# Altium PCB BOARD_4LAYER.PcbDoc (part 11 of 21)
Units mil, origin at the board's own origin, x right, y up, seen from the top; angles counter-clockwise.
Board outline 6692.91 x 10039.37 mil, 4 copper layers (Top Layer, Mid Layer 1, Mid Layer 2, Bottom Layer), stack 66.299 mil thick; 1532 components, 908 nets, 4105 pads, 1286 vias.
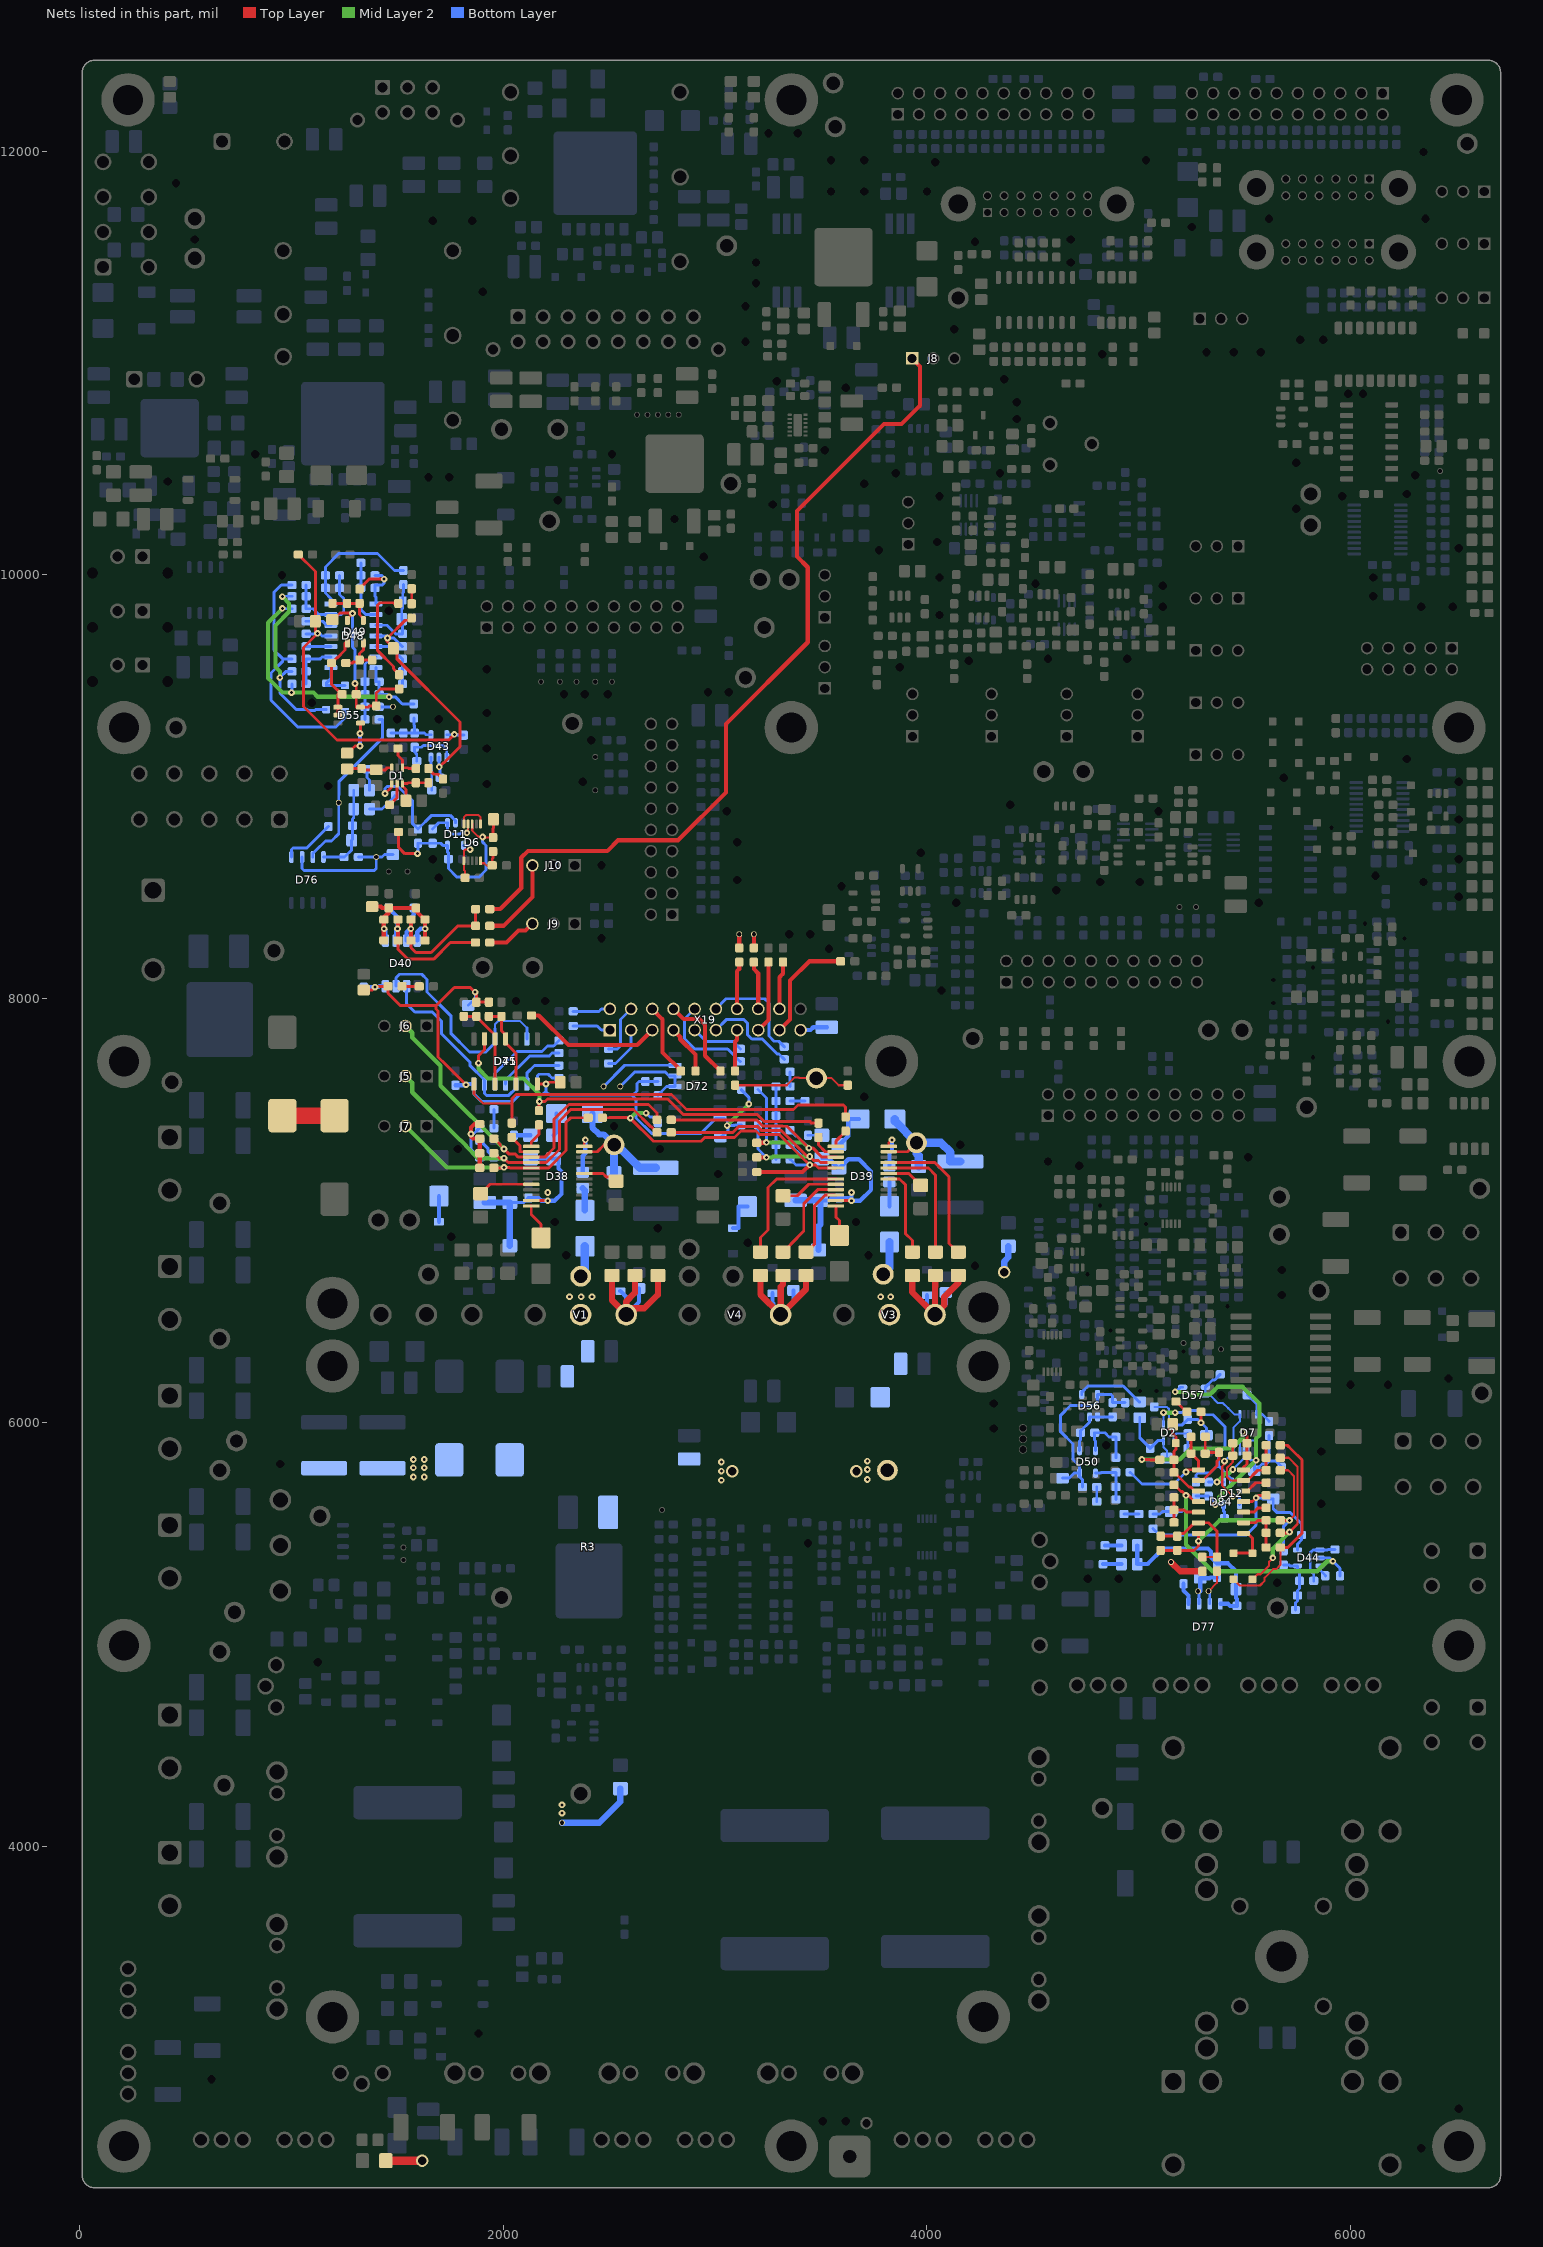
[diagram p13: the nets of this part, all layers, seen from the top]

## Via types
v1: diameter 27.56/31.5/31.5/27.56 (per signal layer), hole 13.78, Top Layer to Bottom Layer, 1270 vias
v2: diameter 59.06, hole 39.37, Top Layer to Bottom Layer, 16 vias

## Nets (pads, with @x,y where several pads share a name; then routed paths per layer and width w, separated by ;. In a path a pad name is that pad's centre, name@x,y a point inside that pad or via, vN(x,y) a via of type N, cw(c..) or ccw(c..) an arc to the next point about the centre after c; other vN are vias at no path point) (continued)
$2N2335: C282.2 R410.1 R414.1 R590.1 V1.1 V52.1 | length 984.7
  Top Layer w29.53: R590.1@2513.78,6694.88 2513.78,6577.17 V1.1@2581.1,6509.84 2609.57,6509.84 2616.64,6516.91 V1.1@2616.64,6539.77 ; R410.1@2622.05,6694.88 2622.05,6612.87 2581.1,6571.93 2581.1,6539.77 V1.1@2616.64,6539.77 ; R414.1@2730.32,6694.88 2730.32,6604.38 2665.71,6539.77 V1.1@2616.64,6539.77
  Bottom Layer w19.68: V52.1@2553.15,6621.06 2581.1,6593.11 V1.1@2581.1,6509.84 2641.73,6570.47 C282.2@2641.73,6633.86
$2N2336: D38.12 V33.2 | length 169.8
  Top Layer w13.78: D38.12@2132.87,7022.64 2132.87,6982.28 2179.13,6936.02 V33.2@2179.13,6872.05
$2N2338: R595.2 V34.2 | length 108.1
  Bottom Layer w19.68: R595.2@2238.19,7356.3 2251.97,7370.08 V34.2@2251.97,7458.66
$2N2339: V35.1 V45.1 | length 121.1
  Bottom Layer w19.68: V45.1@1696.85,6947.83 V35.1@1696.85,7068.9
$2N2340: C301.2 C303.2 D38.23 TP33.1 V34.1 | length 729.9
  Top Layer w13.78: D38.23@2382.87,7278.54 2444.18,7278.54 2476.66,7311.02 TP33.1@2523.62,7311.02
  Bottom Layer w29.53: V34.1@2421.26,7458.66 2421.26,7392.72 2453.54,7360.44 2474.21,7360.44 TP33.1@2523.62,7311.02
  Bottom Layer w39.37: C303.2@2523.62,7179.13 TP33.1@2523.62,7311.02 2537.4,7311.02 2645.67,7202.76 C301.2@2720.47,7202.76
$2N2341: D38.19 R600.1 | length 177.7
  Top Layer w13.78: D38.19@2382.87,7176.18 2471.27,7176.18 2487.13,7160.32 2533.46,7160.32 R600.1@2533.46,7139.76
$2N2342: D39.7 R593.2 | length 656.1
  Top Layer w13.78: R593.2@3214.57,6805.12 3214.57,6873.47 3250.04,6908.95 3250.04,7109.84 3290.79,7150.59 D39.7@3569.88,7150.59
$2N2343: D39.9 R413.2 | length 447.3
  Top Layer w13.78: R413.2@3320.87,6805.12 3359.19,6843.44 3359.19,6844.54 3418.65,6904 3418.65,7033.33 3484.72,7099.41 D39.9@3569.88,7099.41
$2N2344: D39.10 R417.2 | length 358.8
  Top Layer w13.78: R417.2@3429.13,6805.12 3433.07,6805.12 3469.97,6842.02 3469.97,6861.7 3469.97,7024.18 3519.61,7073.82 D39.10@3569.88,7073.82
$2N2345: C285.2 R413.1 R417.1 R593.1 V4.1 V55.1 | length 905
  Top Layer w29.53: R593.1@3214.57,6694.88 3214.57,6604.72 V4.1@3309.45,6509.84 ; R413.1@3320.87,6694.88 3320.87,6652.48 3309.45,6641.06 V4.1@3309.45,6509.84 ; R417.1@3429.13,6694.88 3429.13,6629.53 V4.1@3309.45,6509.84
  Bottom Layer w19.68: V55.1@3271.65,6611.22 3271.65,6565.52 3274.49,6562.68 3274.49,6544.81 V4.1@3309.45,6509.84 3370.08,6570.47 C285.2@3370.08,6624.02
$2N2346: D39.21 R416.2 | length 687.3
  Top Layer w13.78: D39.21@3819.88,7227.36 4036.72,7227.36 4103.82,7160.26 4103.82,6844.99 4143.7,6805.12 R416.2@4147.64,6805.12
$2N2347: D39.18 R592.2 | length 421.5
  Top Layer w13.78: D39.18@3819.88,7150.59 3871.05,7150.59 3897.72,7123.92 3897.72,6893.4 3931.1,6860.02 R592.2@3931.1,6805.12
$2N2348: D39.20 R412.2 | length 596.9
  Top Layer w13.78: D39.20@3819.88,7201.77 4006.6,7201.77 4039.37,7169 R412.2@4039.37,6805.12
$2N2349: C284.2 R412.1 R416.1 R592.1 V3.1 V54.1 | length 878
  Top Layer w29.53: R592.1@3931.1,6694.88 3931.1,6616.54 V3.1@4037.8,6509.84 ; R412.1@4039.37,6694.88 4039.37,6642.72 4037.8,6641.14 V3.1@4037.8,6509.84 ; R416.1@4147.64,6694.88 4147.64,6659.09 4081.7,6593.15 4081.7,6553.74 V3.1@4037.8,6509.84
  Bottom Layer w19.68: V54.1@4000,6601.38 4000,6547.64 V3.1@4037.8,6509.84 4088.58,6560.63 C284.2@4088.58,6614.17
$2N2350: D39.12 V37.2 | length 145.7
  Top Layer w13.78: D39.12@3569.88,7022.64 3569.88,6970.76 3586.61,6954.03 V37.2@3586.61,6883.86
$2N2352: R597.2 V38.2 | length 191.3
  Bottom Layer w19.68: R597.2@3584.49,7312.83 3588.43,7312.83 3628.75,7353.16 3628.75,7433.07 V38.2@3679.13,7433.07
$2N2353: V39.1 V46.1 | length 170.3
  Bottom Layer w19.68: V46.1@3084.65,6918.31 3111.01,6918.31 3111.01,7019.69 V39.1@3153.54,7019.69
$2N2359: D40.7 D41.3 D41.6 | length 1076.6
  Bottom Layer w10: 1961.81,7859.58 1961.54,7859.85 1961.54,7880.3 1976,7894.76 2080.57,7894.76 2111.81,7863.52
  Bottom Layer w13.78: D40.7@1494.68,8059.84 1494.68,8099.22 1511.45,8115.99 1616.63,8115.99 1641.52,8091.1 1641.52,8032.18 1753.36,7920.34 1753.36,7837.22 1841.78,7748.8 1918.29,7748.8 1961.81,7792.32 D41.3@1961.81,7811.02 1961.81,7859.58 ; D41.6@2111.81,7811.02 2111.81,7863.52
$2N2363: D75.4 D75.12 R43.1 R246.1 | length 406.8
  Top Layer w13.78: R246.1@1933.07,7917.32 R43.1@1992.13,7917.32 1992.13,7849.41 2011.81,7829.72 D75.4@2011.81,7811.02 2011.81,7792.32 2061.02,7743.11 2061.02,7688.69 2061.81,7687.91 D75.12@2061.81,7598.43
$2N2365: D40.6 D41.10 D41.13 | length 893.2
  Bottom Layer w13.78: D40.6@1544.68,8059.84 1544.68,7977.28 1583.45,7938.51 1665.57,7938.51 1708.52,7895.56 1708.52,7835.83 1844.53,7699.83 1844.53,7684.41 1911.81,7617.13 D41.13@1911.81,7598.43 1911.81,7553.93 1921.13,7544.61 2026.7,7544.61 2061.81,7579.72 D41.10@2061.81,7598.43
$2N2367: FB2.2 R177.1 | length 80.7
  Top Layer w13.78: R177.1@1523.62,8059.06 FB2.2@1604.33,8059.06
$2N2369: D39.8 R603.1 | length 271.4
  Top Layer w13.78: R603.1@3320.87,7070.87 3388.13,7070.87 3442.27,7125 D39.8@3569.88,7125
$2N2396: KW1.1 R604.1 | length 171.3
  Top Layer w39.37: R604.1@1446.85,2517.72 KW1.1@1618.11,2517.72
$2N2397: KW2.1 R605.1 | length 130.2
  Bottom Layer w29.53: KW2.1@4364.17,6710.63 4364.17,6760.83 4383.86,6780.51 R605.1@4383.86,6832.68
$2N2406: D75.5 D75.10 R44.1 R245.1 | length 415.6
  Top Layer w13.78: R44.1@1814.96,7917.32 R245.1@1874.02,7917.32 1874.02,7915.35 1941.28,7848.09 1943.44,7848.09 1961.81,7829.72 D75.5@1961.81,7811.02 D75.10@1961.81,7598.43
$2N2408: C1.1 C2.1 R3.2 R607.2 R610.2 TP8.1 TP27.1 TP28.1 V1.2 V3.2 V32.1 V36.1 V44.2 | length 313.7
  Bottom Layer w39.37: TP28.1@2366.14,6690.94 2385.83,6710.63 V32.1@2385.83,6832.68 ; TP27.1@3793.31,6700.79 3822.83,6730.31 V36.1@3822.83,6852.36
  other v1: 3029.53,5728.35 3718.5,5732.28 3029.53,5771.65 3718.5,5779.53 3029.53,5814.96 3718.5,5818.9 2312.99,6594.49 2368.11,6594.49 2419.29,6594.49 3781.5,6594.49 3828.74,6594.49
  other v2: 3080.71,5771.65 3667.32,5771.65
$2N2412: D39.2 R35.1 | length 131.2
  Top Layer w13.78: R35.1@3488.19,7346.46 3488.19,7309.96 3519.61,7278.54 D39.2@3569.88,7278.54
$2N2413: D75.6 R35.2 R36.2 | length 1937.1
  Top Layer w13.78: v1(1883.86,7696.85) 1883.86,7731.39 1911.81,7759.35 D75.6@1911.81,7811.02 ; R36.2@2169.29,7472.44 2169.29,7506.89 2171.26,7508.86 v1(2171.26,7515.75) 2197.83,7515.75 2209.65,7527.56 2777.36,7527.56 2851.42,7453.49 3199.7,7453.49 3231.06,7422.13 3446.96,7422.13 3455.71,7413.39 R35.2@3488.19,7413.39
  Mid Layer 2 w19.68: v1(1883.86,7696.85) 1883.86,7670.2 1929.16,7624.9 2096.34,7624.9 2171.26,7549.98 v1(2171.26,7515.75)
$2N2414: D38.1 R36.1 | length 116.5
  Top Layer w13.78: D38.1@2132.87,7304.13 2132.87,7324.8 2169.29,7361.22 R36.1@2169.29,7405.51
$2N2415: D75.8 R37.2 R38.2 | length 2032.2
  Top Layer w10: 1861.81,7550.44 1906.36,7505.89 2041.34,7505.89
  Top Layer w13.78: 1861.81,7550.44 D75.8@1861.81,7598.43 ; R38.2@2041.34,7413.39 2041.34,7505.89 2041.34,7528.54 2060.83,7548.03 2794.96,7548.03 2865.63,7477.36 3370.4,7477.36 3391.76,7498.72 3606.4,7498.72 3616.14,7488.98 R37.2@3616.14,7442.91
$2N2416: D39.1 R37.1 | length 91
  Top Layer w13.78: D39.1@3569.88,7304.13 3569.88,7327.76 3616.14,7374.02 R37.1@3616.14,7375.98
$2N2417: D38.2 R38.1 | length 136.4
  Top Layer w13.78: R38.1@2041.34,7346.46 2041.34,7344.49 2080.71,7305.12 2080.71,7278.54 D38.2@2132.87,7278.54
$2N2418: D39.5 R39.2 R53.2 R249.1 R580.1 | length 1767.6
  Top Layer w13.78: R39.2@2468.5,7438.98 2502.95,7438.98 2504.92,7440.94 2596.46,7440.94 v1(2600.39,7437.01) 2709.49,7327.91 2934.03,7327.91 2951.59,7345.47 3091.87,7345.47 3122.27,7375.88 3193.8,7375.88 3210.01,7359.67 3303.12,7359.67 3427.46,7235.33 3428.06,7235.33 v1(3446.85,7216.54) 3473.43,7216.54 3488.19,7201.77 D39.5@3569.88,7201.77
  Top Layer w19.68: R580.1@3196.85,7183.07 3413.39,7183.07 v1(3446.85,7216.54)
  Mid Layer 2 w19.68: v1(2600.39,7437.01) 2624.02,7460.63 v1(2675.2,7460.63)
  Bottom Layer w13.78: v1(2675.2,7460.63) 2693.41,7442.41 2705.22,7442.41 2730.32,7417.32 R53.2@2730.32,7415.35 ; R249.1@3354.33,7242.13 3356.3,7242.13 3381.89,7216.54 v1(3446.85,7216.54)
$2N2419: D38.5 J7.2 R39.1 R242.1 | length 1168.7
  Top Layer w10: v1@2001.97,7202.76 v1(2003.94,7204.72)
  Top Layer w13.78: R242.1@1956.69,7202.76 v1@2001.97,7202.76 ; v1(2003.94,7204.72) 2030.51,7204.72 2033.46,7201.77 D38.5@2132.87,7201.77 2215.05,7201.77 2297.31,7284.03 2297.31,7417.58 2318.71,7438.98 R39.1@2401.57,7438.98
  Mid Layer 2 w19.68: J7.2@1539.37,7399.61 1734.25,7204.72 v1(2003.94,7204.72)
$2N2420: D39.3 R40.2 R52.2 R248.1 R581.1 | length 1498.4
  Top Layer w10: v1@3240.16,7320.87 v1(3242.13,7322.83)
  Top Layer w13.78: R40.2@2793.31,7429.13 3196.22,7429.13 3226.09,7399.26 3319.2,7399.26 3319.48,7398.99 3339.2,7398.99 v1(3442.91,7295.28) 3463.01,7295.28 3505.33,7252.95 D39.3@3569.88,7252.95
  Top Layer w19.68: R581.1@3196.85,7320.87 v1@3240.16,7320.87
  Mid Layer 2 w19.68: v1(3242.13,7322.83) 3415.35,7322.83 v1(3442.91,7295.28)
  Bottom Layer w13.78: R52.2@3202.76,7572.83 3242.83,7532.76 3242.83,7353.34 3242.13,7352.63 v1(3242.13,7322.83) ; R248.1@3354.33,7379.92 3380.76,7353.49 3384.69,7353.49 v1(3442.91,7295.28)
$2N2421: D38.3 J6.2 R40.1 R243.1 | length 1813
  Top Layer w10: 1986.48,7312.73 1986.48,7308.79 v1(2003.94,7291.34)
  Top Layer w13.78: R243.1@1956.69,7340.55 1958.66,7340.55 1986.48,7312.73 ; v1(2003.94,7291.34) 2026.47,7268.8 2056,7268.8 2071.85,7252.95 D38.3@2132.87,7252.95 2196.67,7252.95 2240.21,7296.49 2240.21,7431.83 2310.25,7501.87 2686.12,7501.87 2726.38,7461.61 R40.1@2726.38,7429.13
  Mid Layer 2 w19.68: J6.2@1539.37,7872.05 1571.38,7840.03 1571.38,7818.09 1705.13,7684.35 1705.13,7590.15 v1(2003.94,7291.34)
$2N2422: D39.4 R41.2 R51.2 R247.1 R582.1 | length 1396.1
  Top Layer w13.78: R41.2@2793.31,7370.08 3084.61,7370.08 3113.04,7398.51 3199,7398.51 3217.94,7379.58 3311.05,7379.58 3434.72,7255.91 v1(3446.85,7255.91) 3465.64,7237.11 3488.28,7237.11 3498.03,7227.36 D39.4@3569.88,7227.36
  Top Layer w19.68: R582.1@3196.85,7251.97 v1(3242.13,7251.97)
  Mid Layer 2 w19.68: v1(3242.13,7251.97) 3268.78,7251.97 3272.72,7255.91 v1(3446.85,7255.91)
  Bottom Layer w13.78: R51.2@3202.76,7405.51 3202.76,7291.34 v1(3242.13,7251.97) ; R247.1@3354.33,7311.02 3356.3,7311.02 3411.42,7255.91 v1(3446.85,7255.91)
$2N2423: D38.4 J5.2 R41.1 R244.1 | length 1669.1
  Top Layer w10: 1983.75,7246.56 2002.47,7246.56 v1(2003.94,7248.03)
  Top Layer w13.78: R244.1@1956.69,7271.65 1958.66,7271.65 1983.75,7246.56 ; v1(2003.94,7248.03) 2024.61,7227.36 D38.4@2132.87,7227.36 2132.99,7227.24 2203.1,7227.24 2265.47,7289.61 2265.47,7424.19 2319.17,7477.89 2615.67,7477.89 2697.05,7396.51 2699.95,7396.51 R41.1@2726.38,7370.08
  Mid Layer 2 w19.68: J5.2@1539.37,7635.83 1571.38,7603.81 1571.38,7559.24 1799.75,7330.87 1801.81,7330.87 1824.96,7307.71 1824.96,7305.66 1882.59,7248.03 v1(2003.94,7248.03)
$2N2424: C22.2 R176.2 R247.2 R248.2 R249.2 R583.2 | length 344.5
  Bottom Layer w13.78: R249.2@3287.4,7242.13 R247.2@3287.4,7311.02 R248.2@3287.4,7379.92 C22.2@3287.4,7448.82 R583.2@3287.4,7517.72 R176.2@3287.4,7586.61
$2N2425: C18.2 C165.1 C292.1 C293.1 D40.1 D40.4 FB3.1 R250.1 R251.1 | length 689.4
  Top Layer w10: R251.1@1629.92,8374.02 R251.1@1631.89,8374.02
  Top Layer w19.68: C165.1@1381.89,8435.04 1423.23,8435.04 1429.13,8429.13 C18.2@1460.63,8429.13 ; C292.1@1437.01,8275.59 v1@1437.01,8330.71 ; v1(1438.98,8330.71) v1@1437.01,8330.71 ; R251.1@1629.92,8374.02 1588.58,8415.35 FB3.1@1588.58,8429.13 C18.2@1460.63,8429.13 ; C293.1@1631.89,8275.59 v1(1631.89,8330.71) R251.1@1631.89,8374.02 ; v1@1437.01,8330.71 R250.1@1437.01,8374.02 1437.01,8382.72 1460.63,8406.34 C18.2@1460.63,8429.13
  Bottom Layer w19.68: v1(1438.98,8330.71) 1444.69,8325 D40.1@1444.68,8274.8 ; D40.4@1594.68,8274.8 1594.68,8315.24 1610.16,8330.71 v1(1631.89,8330.71)
$2N2426: C292.2 D40.2 R250.2 R621.2 R624.1 | length 735.5
  Top Layer w13.78: C292.2@1503.94,8275.59 1503.94,8233.87 1550.66,8187.14 1672.4,8187.14 1751.01,8265.75 R624.1@1870.08,8265.75
  Top Layer w19.68: v1(1501.97,8330.71) v1@1503.94,8328.74 ; C292.2@1503.94,8275.59 v1@1503.94,8328.74 ; R250.2@1503.94,8374.02 v1@1503.94,8328.74
  Bottom Layer w19.68: R621.2@1460.63,8429.13 1460.63,8427.17 1501.97,8385.83 v1(1501.97,8330.71) 1494.68,8323.43 D40.2@1494.68,8274.8
$2N2430: C305.2 C306.2 R598.1 R599.1
  other v1: 1576.77,5744.09 1627.95,5744.09 1576.77,5787.4 1627.95,5787.4 1576.77,5826.77 1627.95,5826.77
$2N3722: D41.9 R42.2 | length 217.6
  Bottom Layer w13.78: D41.9@2111.81,7598.43 2111.81,7649.2 2147.65,7685.04 R42.2@2263.78,7685.04
$2N3726: D41.8 R579.1 | length 151.4
  Bottom Layer w13.78: D41.8@2161.81,7598.43 2161.81,7637.29 2168.88,7644.36 2212.85,7644.36 2231.22,7625.98 R579.1@2263.78,7625.98
$2N3778: C19.2 C257.2 C308.2 C319.2 D39.11 R596.1 R597.1 | length 1112.6
  Top Layer w13.78: D39.11@3569.88,7048.23 3642.72,7048.23 v1(3643.7,7047.24)
  Bottom Layer w13.78: R596.1@3503.62,7246.06 R596.1@3537.09,7246.06
  Bottom Layer w19.68: C319.2@3498.03,7049.21 3537.4,7049.21 3549.21,7061.02 C19.2@3586.61,7061.02 3640.91,7061.02 v1@3643.7,7058.23 ; R596.1@3537.09,7246.06 3580.55,7202.6 R597.1@3584.49,7202.6 3588.43,7202.6 3628.75,7242.92 3678.34,7242.92 3735.86,7185.4 3735.86,7098.81 3684.3,7047.24 v1(3643.7,7047.24) v1@3643.7,7058.23 ; v1(3643.7,7086.61) v1@3643.7,7058.23
  Bottom Layer w29.53: C257.2@3379.92,7049.21 C319.2@3498.03,7049.21 3498.03,6937.01 3488.19,6927.17 C308.2@3488.19,6814.96
$2N3783: FB66.1 R594.1 | length 78.7
  Bottom Layer w19.68: FB66.1@2051.18,7356.3 R594.1@2129.92,7356.3
$2N3800: C20.2 C258.2 C307.2 C320.2 D38.11 R594.2 R595.1 | length 967.4
  Top Layer w13.78: D38.11@2132.87,7048.23 2209.65,7048.23 v1(2210.63,7047.24)
  Bottom Layer w13.78: C320.2@2031.5,7039.37 2098.43,7039.37 C20.2@2120.08,7061.02
  Bottom Layer w19.68: C20.2@2120.08,7061.02 2167.32,7061.02 2181.1,7047.24 v1@2202.41,7047.24 ; R594.2@2129.92,7246.06 R595.1@2238.19,7246.06 2260.66,7246.06 2260.66,7198.82 2274.82,7184.66 2274.82,7079.3 2242.76,7047.24 v1(2210.63,7047.24)
  Bottom Layer w29.53: C258.2@1913.39,7039.37 C320.2@2031.5,7039.37 C307.2@2031.5,6834.65
  other v1: 2210.63,7086.61
$2N3805: FB67.1 R596.2 | length 65.1
  Bottom Layer w13.78: FB67.1@3438.5,7356.3 R596.2@3503.62,7356.3
$2N3899: FB68.1 R583.1 | length 70.9
  Bottom Layer w13.78: R583.1@3354.33,7517.72 FB68.1@3425.2,7517.72
$2N3993: R545.1 X19.19 | length 129.3
  Bottom Layer w19.68: X19.19@3403.94,7852.36 3449.72,7852.36 3463.5,7866.14 R545.1@3527.56,7866.14
$2N3999: R460.2 X19.13 | length 196.8
  Top Layer w19.68: R460.2@3094.49,7659.45 3094.49,7797.64 3103.94,7807.09 X19.13@3103.94,7852.36
$2N4000: C221.1 R460.1 TP37.1 | length 562.1
  Top Layer w10: R460.1@3094.49,7592.52 3338.58,7592.52 3375.48,7629.42 3395.14,7629.42 3398.57,7625.98 TP37.1@3478.35,7625.98 3550.2,7625.98 3583.66,7592.52 C221.1@3625.98,7592.52
$2N4020: R463.2 X19.3 | length 220.4
  Bottom Layer w13.78: R463.2@2498.03,7694.88 2530.59,7694.88 2603.94,7768.23 X19.3@2603.94,7852.36
$2N4021: R459.2 X19.10 | length 469.2
  Bottom Layer w13.78: X19.10@2903.94,7952.36 2875.35,7923.77 2875.29,7923.77 2855.31,7903.79 2855.31,7812.93 2904.55,7763.69 3036.93,7763.69 3037.45,7763.17 3059.67,7763.17 3118.11,7704.72 R459.2@3120.08,7704.72
$2N4022: R458.2 X19.8 | length 428.5
  Top Layer w19.68: X19.8@2803.94,7952.36 2852.02,7904.28 2926.78,7904.28 2953.39,7877.67 2953.39,7731.65 R458.2@3025.59,7659.45
$2N4024: R456.2 X19.4 | length 256.5
  Bottom Layer w13.78: R456.2@2498.03,7763.78 2539.15,7763.78 2553.94,7778.57 2553.94,7902.36 X19.4@2603.94,7952.36
$2N4027: R452.2 X19.5 | length 657.3
  Top Layer w19.68: R452.2@2133.86,7921.26 2168.2,7921.26 2307.88,7781.59 2633.16,7781.59 X19.5@2703.94,7852.36
$2N4028: R461.2 X19.12 | length 528.4
  Bottom Layer w13.78: X19.12@3003.94,7952.36 3052.14,8000.57 3234.45,8000.57 3253.94,7981.08 3253.94,7824.66 3278.55,7800.05 3300.35,7800.05 R461.2@3326.77,7773.62
$2N4029: R455.2 X19.11 | length 454.1
  Bottom Layer w13.78: X19.11@3003.94,7852.36 3054.92,7903.35 3134.51,7903.35 3153.99,7883.86 3153.99,7829.38 3173.48,7809.89 3223.16,7809.89 3293.39,7739.66 3301.68,7739.66 R455.2@3326.77,7714.57
$2N4290: D41.11 R584.1 | length 323.3
  Bottom Layer w13.78: D41.11@2011.81,7598.43 2011.81,7617.13 2124.21,7729.52 2216.65,7729.52 2231.22,7744.09 R584.1@2263.78,7744.09
$2N4314: D41.12 R50.2 | length 416.3
  Bottom Layer w13.78: D41.12@1961.81,7598.43 1961.81,7648.84 2065.15,7752.17 2183.24,7752.17 2209.13,7778.06 2238.69,7778.06 R50.2@2263.78,7803.15
$2N4430: D72.4 D72.5 OSC5.1 R253.1 | length 442.6
  Bottom Layer w13.78: OSC5.1@2553.15,7586.61 2620.35,7653.82 2765.99,7653.82 2783.19,7636.61 D72.5@2811.02,7636.61 D72.4@2811.02,7586.61 2771.65,7586.61 2730.32,7545.28 R253.1@2730.32,7543.31
$2N4474: OSC2.1 R48.1 | length 65
  Top Layer w19.68: R48.1@3183.07,8240.16 OSC2.1@3183.07,8305.12
$2N4481: OSC3.1 R46.2 | length 65
  Top Layer w19.68: R46.2@3114.17,8240.16 OSC3.1@3114.17,8305.12
$2N4659: D38.8 R601.1 | length 257.5
  Top Layer w13.78: R601.1@1893.7,7080.71 1937.99,7125 D38.8@2132.87,7125
$2N4670: C302.2 C304.2 D39.23 TP34.1 V38.1 | length 688.7
  Top Layer w13.78: D39.23@3819.88,7278.54 3908.46,7278.54 TP34.1@3950.79,7320.87
  Bottom Layer w39.37: V38.1@3848.43,7433.07 3848.43,7423.23 TP34.1@3950.79,7320.87 ; C304.2@3960.63,7208.66 3960.63,7260.75 3950.79,7270.59 TP34.1@3950.79,7320.87 ; C302.2@4157.48,7232.28 4110.06,7232.28 4110.06,7276.65 4065.85,7320.87 TP34.1@3950.79,7320.87
$2N4671: D39.19 R602.1 | length 173.8
  Top Layer w13.78: D39.19@3819.88,7176.18 3914.37,7176.18 R602.1@3970.47,7120.08
$2N4684: R673.2 V32.2 | length 108.4
  Bottom Layer w29.53: R673.2@2375.98,7106.3 2385.83,7096.46 V32.2@2385.83,7001.97
$2N4685: D38.24 R673.1 | length 191
  Top Layer w13.78: D38.24@2382.87,7304.13 2382.87,7329.72 v1(2387.8,7334.65)
  Bottom Layer w19.68: R673.1@2375.98,7181.1 2375.98,7257.87 2387.8,7269.69 v1(2387.8,7334.65)
$2N4693: R674.2 V36.2 | length 114.2
  Bottom Layer w19.68: V36.2@3822.83,7021.65 R674.2@3822.83,7135.83
$2N4694: D39.24 R674.1 | length 167.1
  Top Layer w10: D39.24@3819.88,7304.13 3819.88,7322.52 3832.01,7334.65 v1(3834.65,7334.65)
  Bottom Layer w19.68: R674.1@3822.83,7210.63 3822.83,7272.64 3834.65,7284.45 v1(3834.65,7334.65)
$2N4762: D72.6 OSC4.1 | length 378
  Bottom Layer w13.78: OSC4.1@2474.41,7586.61 2574.41,7686.61 D72.6@2811.02,7686.61
$2N4772: C17.2 C108.2 C166.1 C167.1 C168.1 C201.2 D40.8 D41.14 D72.14 D75.14 R177.2 R245.2 R246.2 R252.2 R253.2 R254.2 R255.2 | length 3603.1
  Top Layer w13.78: C167.1@1342.52,8041.34 1382.95,8041.34 1395.67,8054.06 v1(1395.67,8055.12) 1399.61,8059.06 R177.2@1456.69,8059.06 1456.69,8026.57 1515.58,7967.69 1668.4,7967.69 1683.4,7967.69 ; v1(1824.8,7594.49) 1730.25,7689.04 1693.4,7725.89 1693.4,7942.69 1683.4,7952.69 1683.4,7967.69 ; R246.2@1933.07,7984.25 R245.2@1874.02,7984.25 1874.02,8030.52 1873.04,8031.5 v1(1868.11,8031.5) 1845.47,8054.13 1769.85,8054.13 1683.4,7967.69 ; D75.14@2161.81,7598.43 v1(2202.76,7598.43) 2210.63,7606.3 C108.2@2269.68,7606.3
  Mid Layer 2 w19.68: v1(3057.09,7401.57) v1(3159.45,7503.94)
  Bottom Layer w10: C168.1@1834.65,7968.5 1867.11,8000.97 1868.11,8000.97 v1(1868.11,8031.5)
  Bottom Layer w13.78: D41.14@1861.81,7598.43 1861.81,7551.88 1896.87,7516.82 2045.66,7516.82 2076.28,7547.44 2184.78,7547.44 2200.63,7563.28 2202.76,7563.28 ; v1(2202.76,7598.43) 2202.76,7563.28 ; R253.2@2730.32,7610.24 R252.2@2671.26,7610.24 2641.32,7610.24 2631.57,7600.49 2631.57,7565.16 2612.09,7545.67 ; C166.1@3025.59,7348.43 3029.53,7348.43 3060.52,7379.42 3060.52,7398.14 v1(3057.09,7401.57) ; R255.2@3124.02,7405.51 3093.43,7405.51 3089.49,7401.57 v1(3057.09,7401.57) ; R254.2@3124.02,7572.83 3124.02,7570.87 3159.45,7535.43 v1(3159.45,7503.94) ; 2202.76,7563.28 2220.37,7545.67 2612.09,7545.67 ; 2612.09,7545.67 2612.09,7541.69 2627.59,7526.19 2627.59,7438.32 2702.24,7363.67 2931.97,7363.67 3004.92,7436.61 D72.14@3023.62,7436.61 3042.32,7436.61 3060.69,7418.24 3060.69,7405.18 v1(3057.09,7401.57)
  Bottom Layer w19.68: C201.2@1342.52,8055.12 v1(1395.67,8055.12) 1411.34,8055.12 1416.06,8059.84 D40.8@1444.68,8059.84 ; C17.2@1775.59,7592.52 v1@1824.8,7592.52 ; v1(1824.8,7594.49) v1@1824.8,7592.52 ; D41.14@1861.81,7598.43 1830.71,7598.43 v1@1824.8,7592.52
$2N4776: FB69.1 R176.1 | length 68.9
  Bottom Layer w13.78: R176.1@3354.33,7586.61 FB69.1@3354.33,7655.51
$2N4796: FB70.1 R585.1 | length 108.8
  Bottom Layer w13.78: FB70.1@1889.76,7330.71 1891.73,7330.71 1929.63,7292.81 1929.63,7277.06 1954.72,7251.97 R585.1@1956.69,7251.97
$2N4802: FB71.1 R175.1 | length 88.6
  Bottom Layer w13.78: R175.1@1956.69,7389.76 FB71.1@1956.69,7478.35
$2N4835: C21.2 R175.2 R242.2 R243.2 R244.2 R585.2 | length 456
  Top Layer w19.68: R242.2@1889.76,7202.76 R244.2@1889.76,7271.65 R243.2@1889.76,7340.55 1857.2,7340.55 1848.43,7349.33 v1(1848.43,7362.2) 1848.43,7393.29 1864.58,7409.45 C21.2@1889.76,7409.45
  Bottom Layer w13.78: R585.2@1889.76,7251.97 1887.8,7251.97 1848.43,7291.34 v1(1848.43,7362.2) 1860.24,7362.2 1887.8,7389.76 R175.2@1889.76,7389.76
$2N4894: R451.2 X19.2 | length 178
  Bottom Layer w13.78: R451.2@2330.71,7940.94 2452.09,7940.94 2463.5,7952.36 X19.2@2503.94,7952.36
$2N4895: R462.2 X19.1 | length 181.4
  Bottom Layer w13.78: R462.2@2330.71,7872.05 2443.82,7872.05 2463.5,7852.36 X19.1@2503.94,7852.36
$2N4896: R453.2 X19.6 | length 348.7
  Top Layer w19.68: X19.6@2703.94,7952.36 2752.86,7903.44 2752.86,7747.14 2838.58,7661.42 R453.2@2838.58,7659.45
$2N4897: R457.2 X19.7 | length 235.8
  Top Layer w19.68: X19.7@2803.94,7852.36 2835.95,7820.35 2835.95,7809.24 2907.48,7737.71 R457.2@2907.48,7659.45
$2N4899: R454.2 X19.9 | length 252.8
  Bottom Layer w13.78: X19.9@2903.94,7852.36 2956.79,7799.51 3084.35,7799.51 R454.2@3120.08,7763.78
$2N4900: R46.1 X19.14 | length 225.1
  Top Layer w19.68: X19.14@3103.94,7952.36 3103.94,8130.43 3114.17,8140.67 R46.1@3114.17,8173.23
$2N4902: R48.2 X19.16 | length 229.5
  Top Layer w19.68: R48.2@3183.07,8173.23 3183.07,8140.67 3203.94,8119.8 X19.16@3203.94,7952.36
$2N4906: R47.1 X19.17 | length 530.7
  Top Layer w19.68: X19.17@3303.94,7852.36 3353.94,7902.36 3353.94,8085.97 3445.14,8177.17 R47.1@3592.52,8177.17
$2N4911: R49.2 X19.18 | length 227.9
  Top Layer w19.68: X19.18@3303.94,7952.36 3303.94,8101.7 3320.87,8118.63 R49.2@3320.87,8173.23
$2N4912: R45.2 X19.15 | length 340.8
  Top Layer w19.68: X19.15@3203.94,7852.36 3251.97,7900.39 R45.2@3251.97,8173.23
$2N4965: J8.1 R623.2 | length 3959.7
  Top Layer w19.68: R623.2@1937.01,8423.23 1986.46,8423.23 2085.58,8522.35 2085.58,8666.11 2117.05,8697.57 2491.79,8697.57 2542.7,8748.48 2825.68,8748.48 3051.21,8974.01 3051.21,9296.16 3437.54,9682.49 3437.54,10036.57 3386.79,10087.32 3386.79,10302.19 3796.94,10712.33 3880.3,10712.33 3966.77,10798.8 3966.77,10984.41 J8.1@3929.53,11021.65
$2N4984: J9.3 R624.2 | length 237.9
  Top Layer w19.68: R624.2@1937.01,8265.75 2015.83,8265.75 2072.39,8322.32 2106.17,8322.32 J9.3@2138.19,8354.33
$2N5012: J10.3 R625.2 | length 406.6
  Top Layer w19.68: R625.2@1937.01,8344.49 2001.58,8344.49 2138.19,8481.1 J10.3@2138.19,8629.92
$2N5015: C293.2 D40.3 R251.2 R622.2 R623.1 R625.1 | length 749.7
  Top Layer w13.78: C293.2@1564.96,8275.59 1564.96,8241.36 1588.21,8218.11 1660.71,8218.11 1787.09,8344.49 R625.1@1870.08,8344.49 R623.1@1870.08,8423.23
  Top Layer w19.68: C293.2@1564.96,8275.59 v1(1564.96,8330.71) R251.2@1564.96,8374.02
  Bottom Layer w19.68: D40.3@1544.68,8274.8 1544.68,8315.24 1560.16,8330.71 v1(1564.96,8330.71) 1564.96,8382.8 1578.74,8396.57 R622.2@1578.74,8429.13
$2N5063: OSC8.1 R606.1 | length 378.6
  Bottom Layer w29.53: OSC8.1@2277.56,4112.2 2453.46,4112.2 2553.15,4211.89 R606.1@2553.15,4273.62
  other v1: 2277.56,4157.48 2277.56,4196.85
$3N4430: C95.2 D1.5 | length 116.2
  Top Layer w13.78: C95.2@1464.57,8915.35 1466.54,8915.35 1500,8948.82 D1.5@1500,9015.75
$3N4432: D1.1 R54.2 R256.1 | length 164.1
  Top Layer w13.78: R54.2@1503.94,9181.1 1503.94,9148.62 1525.59,9126.97 D1.1@1525.59,9090.55 1549.21,9090.55 1553.15,9086.61 R256.1@1588.58,9086.61
$3N4433: D1.4 D11.2 R257.1 | length 614.1
  Top Layer w13.78: v1(1442.91,8968.5) 1474.41,9000 D1.4@1474.41,9015.75
  Bottom Layer w13.78: v1(1442.91,8968.5) 1442.91,8992.8 1452.14,9002.03 1504.71,9002.03 1573.34,8933.4 1573.34,8826.27 R257.1@1598.43,8801.18 1663.08,8865.84 1750.31,8865.84 1775.59,8840.55 D11.2@1775.59,8830.71
$3N4434: D6.9 D11.1 R258.1 | length 261.6
  Top Layer w10: v1(1828.74,8783.46) 1834.65,8789.37 D6.9@1834.65,8824.8
  Bottom Layer w13.78: R258.1@1667.32,8801.18 1696.85,8830.71 D11.1@1738.19,8830.71 1738.19,8796.26 1756.35,8778.1 1796.8,8778.1 1802.17,8783.46 v1(1828.74,8783.46)
$3N4435: D6.6 D6.10 | length 150.8
  Top Layer w10: D6.10@1814.96,8824.8 1814.96,8856.18 1826.16,8867.38 1882.5,8867.38 1893.7,8856.18 D6.6@1893.7,8824.8
$3N4436: C100.2 D1.3 R140.2 R311.2 | length 218
  Top Layer w13.78: R311.2@1263.78,9084.65 1265.75,9086.61 R140.2@1332.68,9086.61 1338.58,9080.71 C100.2@1401.57,9080.71 1443.9,9080.71 1453.74,9090.55 D1.3@1474.41,9090.55
$3N4438: FB5.1 R178.1 | length 90.4
  Top Layer w13.78: R178.1@1647.64,9086.61 1647.64,9084.65 1672.73,9059.56 1694.38,9059.56 FB5.1@1716.54,9037.4
$3N4439: C110.2 D1.6 R178.2 R256.2 | length 210.9
  Top Layer w13.78: C110.2@1541.34,8935.04 1541.34,8988.19 1525.59,9003.94 D1.6@1525.59,9015.75 1549.21,9015.75 1553.15,9019.68 R256.2@1588.58,9019.68 R178.2@1647.64,9019.68
$3N4442: D6.5 R55.2 R259.2 | length 137.6
  Top Layer w10: D6.5@1893.7,8651.57 1893.7,8639.83 1911.3,8639.83 1921.21,8629.92 R55.2@1948.82,8629.92
  Top Layer w13.78: R55.2@1948.82,8629.92 1948.82,8660.51 1952.76,8664.45 R259.2@1952.76,8694.88
$3N4443: C23.2 C109.2 D6.8 D11.5 R186.2 R257.2 R258.2 R259.1 | length 1080.1
  Top Layer w10: D6.8@1854.33,8824.8 1854.33,8793.43 1878.85,8768.91 1883.99,8763.78 v1(1903.54,8763.78) 1905.51,8761.81 R259.1@1952.76,8761.81
  Top Layer w13.78: R186.2@1505.91,8787.4 1505.91,8715.45 1536.32,8685.04 v1(1596.46,8685.04) ; R259.1@1952.76,8761.81 1952.76,8804.06 1954.72,8806.02 C109.2@1954.72,8846.46
  Bottom Layer w13.78: v1(1596.46,8685.04) 1598.43,8687.01 R257.2@1598.43,8734.25 R258.2@1667.32,8734.25 1705.63,8734.25 1715.47,8724.41 D11.5@1738.19,8724.41 1738.19,8691.85 1740,8690.04 1742.13,8690.04 C23.2@1742.13,8659.45 1742.13,8614.59 1781.32,8575.39 1887.68,8575.39 1919.62,8607.32 1919.62,8723.02 1903.54,8739.09 v1(1903.54,8763.78)
$3N4445: D6.1 D11.4 R56.2 | length 207.7
  Top Layer w10: R56.2@1820.87,8570.87 1820.87,8602.36 1814.96,8608.27 D6.1@1814.96,8651.57 1814.96,8697.65 1822.03,8704.72 v1(1844.49,8704.72)
  Bottom Layer w13.78: D11.4@1812.99,8724.41 1835.71,8724.41 1844.49,8715.63 v1(1844.49,8704.72)
$3N4518: D48.2 R316.1 R317.2 R318.2 | length 237.7
  Bottom Layer w13.78: R316.1@1070.87,9486.22 R318.2@1070.87,9545.28 R317.2@1070.87,9604.33 1137.32,9604.33 1145.59,9612.6 D48.2@1187.01,9612.6
$3N4519: D48.3 R57.1 | length 116.5
  Bottom Layer w13.78: R57.1@1070.87,9663.39 1144.8,9663.39 1145.59,9662.6 D48.3@1187.01,9662.6
$3N4520: D48.5 R58.1 | length 124
  Bottom Layer w13.78: R58.1@1070.87,9781.5 1149.41,9781.5 1168.31,9762.6 D48.5@1187.01,9762.6
$3N4521: D48.1 V5.2 V6.1 | length 181.4
  Bottom Layer w13.78: D48.1@1187.01,9562.6 1187.01,9510.83 V6.1@1165.35,9489.17 1165.35,9478.89 1223.89,9478.89 1224.33,9479.33 V5.2@1253.94,9479.33
$3N4522: R318.1 R319.2 V6.2 | length 873.5
  Mid Layer 2 w19.68: v1(946.85,9515.75) 946.85,9544.96 925.46,9566.35 925.46,9761.59 990.32,9826.45 990.32,9865.98 v1(958.66,9897.64)
  Bottom Layer w13.78: v1(958.66,9897.64) 960.63,9899.61 R319.2@1003.94,9899.61 ; R318.1@1003.94,9545.28 976.38,9545.28 v1(946.85,9515.75) 946.85,9442.17 1023.86,9365.16 1077.21,9365.16 1081.31,9361.06 1111.61,9361.06 1115.7,9365.16 V6.2@1165.35,9365.16
$3N4523: D43.3 R59.1 | length 157.1
  Bottom Layer w13.78: D43.3@1659.45,9139.76 1659.45,9077.76 1663.39,9073.82 R59.1@1663.39,8984.25
$3N4524: C223.2 D43.1 R464.2 | length 269.8
  Bottom Layer w13.78: R464.2@1592.52,9122.05 1592.52,9154.53 1582.68,9164.37 C223.2@1582.68,9187.01 1615.16,9187.01 1623.66,9195.51 1717.13,9195.51 1734.25,9178.39 D43.1@1734.25,9139.76
$3N4525: C225.2 D48.7 R322.2 R389.1 | length 613.6
  Bottom Layer w13.78: D48.7@1187.01,9862.6 1187.01,9888.77 1161.42,9914.36 R389.1@1161.42,9938.98 C225.2@1161.42,9998.03 1161.42,10038.27 1224.62,10101.47 1407.66,10101.47 1487.48,10021.65 R322.2@1529.53,10021.65
$3N4526: C214.1 D48.9 R320.2 R668.2 | length 301.3
  Bottom Layer w13.78: R320.2@1328.74,10057.09 C214.1@1328.74,9998.03 R668.2@1328.74,9938.98 1328.74,9836.59 1352.73,9812.6 D48.9@1399.61,9812.6
$3N4527: C222.2 D48.14 R316.2 R325.1 R388.2 R664.2 | length 1377.5
  Mid Layer 2 w19.68: v1(958.66,9842.52) 890.82,9774.68 890.82,9512.95 958.89,9444.88 v1(1001.97,9444.88) 1105.11,9444.88 1124.8,9425.2 v1(1462.6,9425.2)
  Bottom Layer w13.78: v1(958.66,9842.52) 960.63,9840.55 R388.2@1003.94,9840.55 ; v1(1001.97,9444.88) 1003.94,9446.85 R316.2@1003.94,9486.22 ; D48.14@1399.61,9562.6 1399.61,9496.06 C222.2@1415.35,9496.06 R325.1@1415.35,9437.01 1450.79,9437.01 v1(1462.6,9425.2) 1491.07,9425.2 1524.53,9391.73 R664.2@1578.74,9391.73
$3N4528: C33.2 D48.12 R390.2 R391.2 | length 268.2
  Bottom Layer w13.78: D48.12@1399.61,9662.6 1465.35,9662.6 1523.62,9604.33 R390.2@1525.59,9604.33 C33.2@1525.59,9545.28 R391.2@1525.59,9486.22
$3N4530: C223.1 C224.1 D43.4 R387.2 R664.1 | length 264.7
  Bottom Layer w13.78: C224.1@1470.47,9253.94 R387.2@1529.53,9253.94 C223.1@1582.68,9253.94 ; R664.1@1578.74,9324.8 1578.74,9291.34 1582.68,9287.4 C223.1@1582.68,9253.94 ; D43.4@1659.45,9246.06 1636.73,9246.06 1628.86,9253.94 C223.1@1582.68,9253.94
$3N4531: C294.1 D49.4 R323.2 R520.2 | length 216
  Top Layer w13.78: C294.1@1194.88,9866.14 R520.2@1263.78,9866.14 R323.2@1322.83,9866.14 1322.83,9812.99 1340.55,9795.28 D49.4@1340.55,9785.43
$3N4534: FB6.2 R179.2 | length 473.7
  Top Layer w13.78: FB6.2@1505.91,9866.14 1484.59,9866.14 1481.89,9868.84 1419.18,9868.84 1408.3,9857.95 1408.3,9642.89 1483.42,9567.76 1483.42,9557.92 1509.84,9531.5 R179.2@1509.84,9529.53
$3N4536: C311.2 D48.10 R321.2 R322.1 V7.2 | length 379.8
  Bottom Layer w13.78: D48.10@1399.61,9762.6 1452.19,9762.6 1492.35,9722.44 R321.2@1525.59,9722.44 1525.59,9787.4 C311.2@1521.65,9791.34 1521.65,9838.58 1526.57,9843.5 V7.2@1526.57,9879.92 1526.57,9914.37 1529.53,9917.32 R322.1@1529.53,9954.72
$3N4537: D49.3 R324.2 R326.2 R656.1 | length 224.8
  Top Layer w13.78: R656.1@1257.87,9584.65 1290.43,9584.65 1292.24,9586.46 1292.24,9588.58 1322.83,9588.58 R326.2@1322.83,9598.43 ; D49.3@1340.55,9679.13 1340.55,9646.57 1322.83,9628.86 R326.2@1322.83,9598.43 ; R324.2@1381.89,9598.43 R326.2@1322.83,9598.43
$3N4546: FB17.2 R563.2 | length 147.3
  Bottom Layer w13.78: R563.2@1370.08,8895.67 1429.13,8895.67 1490.16,8956.69 FB17.2@1490.16,8958.66
$3N4548: C25.2 C169.1 C202.2 D43.2 D48.11 R181.1 | length 1216.6
  Top Layer w13.78: R181.1@1568.9,9797.24 1568.9,9786.34 1538.31,9786.34 v1(1454.72,9702.76) 1451.29,9699.32 1451.29,9688.48 1482.28,9657.48 C169.1@1482.28,9653.54 1498.56,9653.54 1498.56,9604.38 1796.44,9306.5 1796.44,9189.97 1719.74,9113.28 1717.61,9113.28 v1(1698.82,9094.49)
  Bottom Layer w13.78: D48.11@1399.61,9712.6 1454.72,9712.6 v1(1454.72,9702.76) 1484.25,9702.76 1523.62,9663.39 C25.2@1525.59,9663.39 ; D43.2@1696.85,9139.76 v1@1696.85,9094.49 ; v1(1698.82,9094.49) v1@1696.85,9094.49 ; C202.2@1702.76,9043.31 1702.76,9088.58 v1@1696.85,9094.49
$3N4549: C24.2 C170.1 C203.2 D43.5 D48.4 R180.1 | length 1786.6
  Top Layer w13.78: R180.1@1033.46,10096.46 1114.17,10015.75 C170.1@1114.17,9781.5 1114.17,9734.25 v1(1124.02,9724.41) 1057.6,9657.99 1057.6,9379.89 1216.07,9221.43 1743.08,9221.43 v1(1769.68,9248.03)
  Bottom Layer w13.78: C24.2@1070.87,9722.44 v1@1135.75,9722.44 ; v1(1124.02,9724.41) 1133.78,9724.41 v1@1135.75,9722.44 ; D48.4@1187.01,9712.6 1145.59,9712.6 v1@1135.75,9722.44 ; D43.5@1734.25,9246.06 v1@1769.68,9246.06 ; v1(1769.68,9248.03) v1@1769.68,9246.06 ; C203.2@1814.96,9244.09 1771.65,9244.09 v1@1769.68,9246.06
$3N4550: C26.2 C113.2 D49.5 D55.5 R179.1 R260.2 | length 875.8
  Top Layer w13.78: C113.2@1194.88,9789.37 1198.82,9789.37 1229.81,9820.37 1287.9,9820.37 v1(1289.37,9818.9) 1265.75,9795.28 D49.5@1265.75,9785.43 ; v1(1301.18,9488.19) 1307.09,9482.28 R260.2@1307.09,9437.01 1307.09,9375.98 D55.5@1326.77,9375.98 1362.2,9375.98 1368.11,9381.89 C26.2@1401.57,9381.89 1401.57,9442.83 1421.35,9462.6 R179.1@1509.84,9462.6
  Bottom Layer w13.78: v1(1289.37,9818.9) 1289.37,9659.45 1301.18,9647.64 v1(1301.18,9488.19)
$3N4551: D49.1 D55.1 D55.2 R260.1 R656.2 | length 418.4
  Top Layer w13.78: D55.2@1220.47,9338.58 D55.1@1220.47,9375.98 1220.47,9437.01 R260.1@1238.19,9437.01 ; R260.1@1240.16,9437.01 R260.1@1238.19,9437.01 ; D49.1@1265.75,9679.13 1254.67,9679.13 1254.67,9646.4 1218,9609.74 1216.04,9609.74 R656.2@1190.94,9584.65 1190.94,9484.25 R260.1@1238.19,9437.01
$3N4556: D76.7 OSC10.1 R315.2 | length 817.1
  Bottom Layer w13.78: D76.7@1101.97,8669.29 1101.97,8685.45 1118.78,8702.27 1161.64,8745.12 1190.27,8745.12 1224.41,8779.26 OSC10.1@1224.41,8925.2 1224.41,8962.43 1224.93,8962.95 1224.93,9024.65 1430.15,9229.87 1430.15,9318.9 R315.2@1415.35,9318.9
$3N4557: C214.2 D48.8 R323.1 R668.1 | length 348
  Top Layer w13.78: R323.1@1322.83,9933.07 1322.83,9935.04 1368.11,9980.32 v1(1438.98,9980.32)
  Bottom Layer w13.78: C214.2@1395.67,9998.03 1428.23,9998.03 1438.98,9987.28 v1(1438.98,9980.32) 1438.98,9962.68 1428.23,9951.93 1395.67,9951.93 R668.1@1395.67,9938.98 1395.67,9898.82 1399.61,9894.88 D48.8@1399.61,9862.6
$3N4559: D55.4 R311.1 | length 184
  Top Layer w13.78: R311.1@1263.78,9159.45 1267.72,9159.45 1301.18,9192.91 v1(1324.8,9192.91) ; v1(1324.8,9251.97) 1326.77,9253.94 D55.4@1326.77,9301.18
  Bottom Layer w19.68: v1(1324.8,9192.91) v1(1324.8,9251.97)
$3N4561: R317.1 R521.2 V5.1 | length 1141.1
  Bottom Layer w13.78: R317.1@1003.94,9604.33 960.37,9604.33 ; R521.2@1003.94,9952.76 953.55,9952.76 919.4,9918.61 919.4,9645.3 960.37,9604.33 ; V5.1@1253.94,9355.32 1253.94,9324.8 1212.1,9282.96 1030.89,9282.96 904.67,9409.18 904.67,9537.63 960.37,9593.32 960.37,9604.33
$3N4562: C225.1 D48.6 R319.1 R388.1 R389.2 R521.1 | length 486.6
  Bottom Layer w13.78: R521.1@1070.87,9952.76 R319.1@1070.87,9899.61 R388.1@1070.87,9840.55 1103.43,9840.55 1131.38,9812.6 D48.6@1187.01,9812.6 1234.37,9812.6 1248.07,9826.29 1248.07,9888.44 1228.35,9908.16 R389.2@1228.35,9938.98 C225.1@1228.35,9998.03
$3N4565: OSC9.1 R327.2 | length 65
  Bottom Layer w13.78: R327.2@1415.35,9377.95 OSC9.1@1480.32,9377.95
$3N4566: C222.1 D48.13 R315.1 R325.2 R327.1 | length 325.9
  Bottom Layer w13.78: R315.1@1348.43,9318.9 R327.1@1348.43,9377.95 R325.2@1348.43,9437.01 C222.1@1348.43,9496.06 1348.43,9580.12 1380.91,9612.6 D48.13@1399.61,9612.6
$3N5266: FB8.2 R181.2 | length 70.9
  Top Layer w13.78: R181.2@1568.9,9864.17 FB8.2@1568.9,9935.04
$3N5273: FB9.2 R685.2 | length 103.3
  Bottom Layer w13.78: FB9.2@1358.27,9082.68 1358.27,9044.29 1370.08,9032.48 R685.2@1370.08,8984.25
$3N5274: C321.2 D76.6 OSC11.1 R522.2 | length 633.9
  Bottom Layer w13.78: D76.6@1051.57,8669.29 1051.57,8615.49 1061.32,8605.75 1391.83,8605.75 1401.57,8615.49 OSC11.1@1401.57,8669.29 ; R522.2@1316.93,8669.29 OSC11.1@1401.57,8669.29 ; C321.2@1480.32,8681.1 1439.88,8681.1 1428.07,8669.29 OSC11.1@1401.57,8669.29
$3N5275: C27.2 C171.1 D76.8 R522.1 R563.1 R685.1 | length 432.5
  Bottom Layer w13.78: D76.8@1152.36,8669.29 R522.1@1250,8669.29 1251.97,8669.29 1285.43,8702.76 C171.1@1285.43,8748.03 1289.37,8751.97 C27.2@1289.37,8816.93 1289.37,8848.43 1295.28,8854.33 R563.1@1295.28,8895.67 R685.1@1295.28,8984.25
$3N5280: D76.5 R60.2 | length 254.6
  Bottom Layer w13.78: D76.5@1001.18,8669.29 1001.18,8705.28 1008.25,8712.35 1073.84,8712.35 1148.77,8787.27 1149.48,8787.27 R60.2@1175.2,8812.99
$3N5685: C96.2 D2.5 | length 147.7
  Bottom Layer w10: C96.2@5072.83,6074.8 5131.67,6074.8 5141.73,6064.74 D2.5@5141.73,5990.16
$3N5687: D2.1 R61.2 R261.1 | length 161.6
  Bottom Layer w10: D2.1@5167.32,5915.35 5167.32,5939.08 5177.07,5948.82 R261.1@5230.31,5948.82
  Bottom Layer w13.78: R61.2@5230.31,5877.95 R261.1@5230.31,5948.82
$3N5688: D2.4 D12.2 R262.1 | length 839.8
  Mid Layer 2 w19.68: v1(5116.14,6047.24) v1(5171.26,6047.24)
  Bottom Layer w10: D2.4@5116.14,5990.16 v1(5116.14,6047.24)
  Bottom Layer w13.78: v1(5171.26,6047.24) 5201.39,6047.24 5212.43,6058.28 5286.51,6058.28 5307.23,6037.55 5349.27,6037.55 5407.15,5979.68 5407.15,5885.23 5375.89,5853.98 5375.89,5793.06 ; R262.1@5269.69,5720.47 5269.69,5753.03 5279.48,5762.82 5334.97,5762.82 5365.21,5793.06 5375.89,5793.06 ; D12.2@5437.01,5720.47 5437.01,5735.04 5420.82,5751.23 5378.98,5793.06 5375.89,5793.06
$3N5689: D7.9 D12.1 R263.1 | length 278.8
  Mid Layer 2 w19.68: v1(5368.11,5720.47) 5408.32,5760.68 5424.07,5760.68 v1(5442.91,5779.53)
  Bottom Layer w10: v1(5442.91,5779.53) 5496.06,5832.68 D7.9@5496.06,5866.14
  Bottom Layer w13.78: R263.1@5328.74,5720.47 v1(5368.11,5720.47) D12.1@5399.61,5720.47
$3N5690: D7.6 D7.10 | length 171.8
  Bottom Layer w10: D7.10@5476.38,5866.14 5476.38,5909.75 5483.45,5916.82 5548.05,5916.82 5555.12,5909.75 D7.6@5555.12,5866.14
$3N5691: C101.2 D2.3 R141.2 R312.2 | length 333
  Bottom Layer w10: D2.3@5116.14,5915.35 5116.14,5884.76 5131.73,5869.17 5131.89,5869.17 C101.2@5131.89,5832.68
  Bottom Layer w13.78: R312.2@5003.94,6023.62 5003.94,5929.13 R141.2@5053.15,5879.92 ; R141.2@5053.15,5877.95 R141.2@5053.15,5879.92 ; D2.3@5116.14,5915.35 5088.58,5915.35 R141.2@5053.15,5879.92
$3N5693: FB11.1 R182.1 | length 71.6
  Top Layer w13.78: FB11.1@5175.2,6100.39 5224.41,6051.18 R182.1@5226.38,6051.18
$3N5694: C112.2 D2.6 R182.2 R261.2 | length 263.9
  Top Layer w13.78: v1(5293.31,6000) R182.2@5293.31,6051.18
  Bottom Layer w13.78: D2.6@5167.32,5990.16 5204.72,5990.16 R261.2@5230.31,6015.75 5277.56,6015.75 v1(5293.31,6000) 5318.9,5974.41 C112.2@5318.9,5940.94
$3N5697: D7.5 R62.2 R264.2 | length 184.5
  Bottom Layer w10: R62.2@5509.84,6129.92 5511.81,6129.92 5555.12,6086.61 D7.5@5555.12,6039.37
  Bottom Layer w13.78: D7.5@5555.12,6039.37 5582.68,6039.37 5614.17,6007.87 R264.2@5614.17,6005.91
$3N5698: C28.2 C111.2 D7.8 D12.5 D57.5 R187.2 R262.2 R263.2 R264.1 | length 1683.5
  Mid Layer 2 w19.68: v1(5171.26,6145.67) 5226.38,6145.67 5238.19,6133.86 5335.83,6133.86 5348.27,6146.29 5371.42,6169.45 5489.6,6169.45 5568.42,6090.63 5568.42,5940.18 5553.15,5924.91 v1(5553.15,5822.83) 5379.08,5648.77 5379.08,5633.02 v1(5360.24,5614.17)
  Bottom Layer w10: D7.8@5515.75,5866.14 5515.75,5834.76 5527.68,5822.83 v1(5553.15,5822.83)
  Bottom Layer w13.78: v1(5171.26,6145.67) 5175.2,6145.67 5196.85,6167.32 D57.5@5206.69,6167.32 ; R262.2@5269.69,5653.54 R263.2@5328.74,5653.54 5353.83,5628.45 5353.83,5626.48 v1@5360.24,5620.08 ; v1(5360.24,5614.17) v1@5360.24,5620.08 ; C28.2@5403.54,5549.21 5403.54,5579.8 5401.42,5579.8 5399.61,5581.61 D12.5@5399.61,5614.17 5376.89,5614.17 5370.72,5620.34 5360.5,5620.34 v1@5360.24,5620.08 ; v1(5553.15,5822.83) 5545.28,5814.96 C111.2@5545.28,5773.62 5549.21,5773.62 5580.21,5804.62 5600.39,5804.62 5614.17,5818.4 ; R264.1@5614.17,5938.98 5614.17,5818.4 ; R187.2@5673.23,5791.34 5673.23,5793.31 5648.14,5818.4 5614.17,5818.4
$3N5699: D7.1 D12.4 D57.1 D57.2 R63.2 | length 843.2
  Top Layer w10: v1(5403.54,5818.9) 5403.54,5804.24 5393.51,5794.21 5393.51,5702.95 v1(5442.91,5653.54)
  Bottom Layer w10: D57.2@5312.99,6129.92 5336.07,6129.92 5372.65,6093.35 5396.37,6093.35 5421.65,6068.07 5450.35,6039.37 D7.1@5476.38,6039.37 5476.38,6006.52 5445.71,5975.86 5445.71,5861.07 v1(5403.54,5818.9)
  Bottom Layer w13.78: D57.2@5312.99,6129.92 5311.41,6131.51 5311.41,6143.02 5312.99,6144.61 D57.1@5312.99,6167.32 5347.59,6201.92 5357.43,6201.92 R63.2@5383.86,6228.35 ; v1(5442.91,5653.54) 5467.6,5653.54 5474.41,5646.73 D12.4@5474.41,5614.17
$3N5701: D84.2 R329.1 R330.2 R331.2 | length 239
  Top Layer w13.78: D84.2@5494.09,5527.95 5550.8,5527.95 5562.21,5539.37 R329.1@5600.39,5539.37 R330.2@5600.39,5480.31 R331.2@5600.39,5411.42
$3N5702: D84.3 R64.1 | length 114.8
  Top Layer w13.78: D84.3@5494.09,5577.95 5542.73,5577.95 5563.2,5598.43 R64.1@5600.39,5598.43
$3N5703: D84.5 R65.1 | length 122.3
  Top Layer w13.78: D84.5@5494.09,5677.95 5512.8,5677.95 5551.38,5716.54 R65.1@5600.39,5716.54
$3N5704: D84.1 V8.2 V9.1 | length 209.8
  Top Layer w13.78: V9.1@5446.85,5384.84 V8.2@5535.43,5384.84 5535.43,5455.31 5512.8,5477.95 D84.1@5494.09,5477.95
$3N5705: R331.1 R332.2 V9.2 | length 969.9
  Top Layer w10: V9.2@5446.85,5260.83 5447.83,5260.83 5476.46,5232.2 5571.17,5232.2 5593.27,5254.3 5593.27,5269.06 5633.33,5309.13 5648.09,5309.13 5667.32,5328.36 R331.1@5667.32,5411.42
  Top Layer w13.78: R331.1@5667.32,5411.42 5702.12,5411.42 5768.96,5478.26 5768.96,5824.83 5719.68,5874.11 5719.47,5874.11 5699.88,5893.7 R332.2@5667.32,5893.7
$3N5706: D44.3 R66.1 | length 57.8
  Bottom Layer w13.78: D44.3@5854.33,5324.8 5854.33,5305.12 5879.92,5279.53 R66.1@5879.92,5277.56
$3N5707: C227.2 D44.1 R465.2 | length 262.5
  Bottom Layer w13.78: C227.2@5824.8,5253.94 5824.8,5286.42 5808.29,5302.93 5808.29,5386.44 5821.46,5399.61 D44.1@5854.33,5399.61 5890.67,5399.61 5892.64,5401.57 R465.2@5925.2,5401.57
$3N5708: C229.2 D84.7 R335.2 R394.1 | length 825.2
  Top Layer w13.78: v1(5013.78,5826.77) 5051.18,5826.77 5053.15,5824.8 R335.2@5098.43,5824.8 ; v1(5490.16,5956.69) 5509.84,5937.01 C229.2@5509.84,5903.54 R394.1@5509.84,5844.49 5509.84,5805.43 5494.09,5789.68 D84.7@5494.09,5777.95
  Mid Layer 2 w19.68: v1(5013.78,5826.77) 5192.67,5826.77 5244.56,5878.66 5439.64,5878.66 5490.16,5929.18 v1(5490.16,5956.69)
$3N5709: C215.1 D84.9 R333.2 R669.2 | length 326.9
  Top Layer w13.78: D84.9@5281.5,5727.95 5300.2,5727.95 5368.8,5796.55 5368.8,5818.52 5377.95,5827.68 R333.2@5377.95,5860.24 R669.2@5312.99,5860.24 ; R669.2@5312.99,5854.33 R669.2@5312.99,5860.24 ; C215.1@5312.99,5933.07 R669.2@5312.99,5860.24
$3N5710: C226.2 D84.14 R329.2 R338.1 R393.2 R665.2 | length 1208.3
  Top Layer w10: R393.2@5667.32,5775.59 5704.15,5775.59 5731.38,5748.36 5731.38,5560.12 v1(5710.63,5539.37)
  Top Layer w13.78: R338.1@5102.36,5397.64 C226.2@5181.1,5397.64 5260.37,5397.64 5281.5,5418.77 v1(5281.5,5440.94) D84.14@5281.5,5477.95 ; R329.2@5667.32,5539.37 v1(5710.63,5539.37)
  Mid Layer 2 w19.68: v1(5281.5,5440.94) 5379.92,5539.37 v1(5710.63,5539.37)
  Bottom Layer w13.78: R665.2@5683.07,5395.67 5683.07,5511.81 v1(5710.63,5539.37)
$3N5711: C34.2 D84.12 R395.2 R396.2 | length 238.7
  Top Layer w13.78: C34.2@5165.35,5529.53 R395.2@5165.35,5588.58 ; R396.2@5165.35,5647.64 R395.2@5165.35,5588.58 ; D84.12@5281.5,5577.95 5224.31,5577.95 5213.68,5588.58 R395.2@5165.35,5588.58
$3N5713: C227.1 C228.1 D44.4 R392.2 R665.1 | length 287.5
  Bottom Layer w13.78: R665.1@5683.07,5328.74 5709.72,5328.74 5713.66,5324.8 D44.4@5748.03,5324.8 5748.03,5298.23 5757.87,5288.39 C227.1@5757.87,5253.94 5757.87,5217.52 5748.03,5207.68 R392.2@5748.03,5185.04 5748.03,5158.92 5738.19,5149.08 C228.1@5738.19,5116.14
$3N5714: C295.1 D50.4 R336.2 R523.2 | length 226
  Bottom Layer w13.78: D50.4@4795.28,5761.81 4817.99,5761.81 4821.93,5765.75 R336.2@4891.73,5765.75 C295.1@4891.73,5696.85 R523.2@4891.73,5637.8
$3N5717: FB12.2 R183.2 | length 68.9
  Bottom Layer w13.78: FB12.2@4801.18,5627.95 R183.2@4801.18,5696.85
$3N5718: C312.2 D84.10 R334.2 R335.1 V10.2 | length 388.7
  Top Layer w13.78: C312.2@5159.45,5992.13 5159.45,5947.91 5174.21,5933.15 V10.2@5174.21,5903.54 5174.21,5873.94 5165.35,5865.08 R335.1@5165.35,5824.8 R334.2@5165.35,5765.75 5167.32,5765.75 5236.75,5696.32 5244.43,5696.32 5262.8,5677.95 D84.10@5281.5,5677.95
$3N5719: D50.3 R337.2 R339.2 R657.1 | length 293.2
  Bottom Layer w13.78: D50.3@4795.28,5868.11 4795.28,5914.37 4791.34,5918.31 R657.1@4791.34,5952.76 4839.49,5952.76 4859.17,5933.07 R339.2@4891.73,5933.07 R337.2@4891.73,5834.65
$3N5721: C30.2 C172.1 C204.2 D44.2 D84.11 R185.1 | length 1528.8
  Top Layer w13.78: C30.2@5165.35,5706.69 5167.32,5706.69 5199.08,5674.94 5204.99,5674.94 v1(5222.44,5657.48) 5227.85,5662.89 5262.8,5627.95 D84.11@5281.5,5627.95
  Mid Layer 2 w19.68: v1(5222.44,5657.48) 5222.44,5423.95 5347.46,5298.94 5841.18,5298.94 5888.7,5346.46 v1(5915.35,5346.46)
  Bottom Layer w13.78: R185.1@5066.93,5568.9 5099.49,5568.9 5111.14,5580.55 5111.14,5580.71 C172.1@5151.57,5580.71 5203.81,5580.71 5222.44,5599.34 v1(5222.44,5657.48) ; D44.2@5854.33,5362.2 5901.25,5362.2 5915.35,5348.1 v1(5915.35,5346.46) 5948.82,5312.99 C204.2@5948.82,5277.56
$3N5722: C29.2 C173.1 C205.2 D44.5 D84.4 R184.1 | length 1189.2
  Top Layer w13.78: D84.4@5494.09,5627.95 5535.51,5627.95 5535.69,5628.14 5535.69,5628.21 v1(5553.15,5645.67) 5553.23,5645.67 5565.04,5657.48 C29.2@5600.39,5657.48
  Bottom Layer w13.78: R184.1@5066.93,5500 5092.02,5474.91 5093.99,5474.91 5098.71,5470.19 5506.74,5470.19 5553.15,5516.6 v1(5553.15,5645.67) 5577.83,5645.67 5583.18,5640.33 5592.86,5640.33 5593.43,5639.76 C173.1@5633.86,5639.76 5633.86,5594.4 5652.8,5575.46 5715.66,5575.46 5767.72,5523.4 C205.2@5767.72,5470.47 5767.72,5446.31 5748.03,5426.62 D44.5@5748.03,5399.61
$3N5723: C31.2 C114.2 D50.5 D56.5 R183.1 R265.2 | length 871.7
  Bottom Layer w13.78: C114.2@4639.76,5738.19 4670.42,5738.19 4694.04,5761.81 D50.5@4720.47,5761.81 ; R183.1@4734.25,5696.85 4734.25,5731.32 4720.47,5745.1 D50.5@4720.47,5761.81 ; C31.2@4935.04,6094.49 R265.2@4875.98,6094.49 4875.98,6126.04 4868.16,6133.86 D56.5@4805.12,6133.86 4805.12,6099.41 4787.03,6081.33 4677.05,6081.33 4630.83,6035.11 4630.83,5957.13 4688.86,5899.1 4688.86,5825.98 4720.47,5794.37 D50.5@4720.47,5761.81
$3N5724: D50.1 D56.1 D56.2 R265.1 R657.2 | length 288.4
  Bottom Layer w13.78: D50.1@4720.47,5868.11 4720.47,5914.37 4724.41,5918.31 R657.2@4724.41,5952.76 4724.41,5962.6 4726.38,5962.6 4767.72,6003.94 D56.2@4767.72,6027.56 D56.1@4805.12,6027.56 R265.1@4875.98,6027.56
$3N5725: C215.2 D84.8 R336.1 R669.1 | length 543.9
  Top Layer w13.78: v1(5222.44,5767.72) 5232.68,5777.95 D84.8@5281.5,5777.95 5281.5,5820.87 5248.03,5854.33 R669.1@5246.06,5854.33 C215.2@5246.06,5933.07
  Bottom Layer w13.78: R336.1@4958.66,5765.75 4960.63,5765.75 5015.03,5711.35 5166.07,5711.35 v1(5222.44,5767.72)
$3N5726: D56.4 R312.1 | length 326.1
  Bottom Layer w13.78: D56.4@4730.31,6133.86 4730.31,6143.7 4759.18,6172.57 4925.86,6172.57 5000,6098.43 R312.1@5003.94,6098.43
$3N5727: R330.1 R524.2 V8.1 | length 771.8
  Top Layer w10: V8.1@5535.43,5260.83 5559.71,5285.1 5573.57,5285.1 5614.43,5325.97 5614.43,5344.75 v1(5631.89,5362.2) ; R524.2@5667.32,5834.65 5706.45,5834.65 5748.63,5792.46 5748.63,5522.25 v1(5710.63,5484.25)
  Top Layer w13.78: R330.1@5667.32,5480.31 5706.69,5480.31 v1(5710.63,5484.25)
  Mid Layer 2 w19.68: v1(5631.89,5362.2) 5631.89,5405.51 v1(5710.63,5484.25)
$3N5728: C229.1 D84.6 R332.1 R393.1 R394.2 R524.1 | length 499.8
  Top Layer w10: R394.2@5442.91,5844.49 5442.91,5813.9 5433.23,5804.21 5432.69,5804.21 5415.85,5787.38 5415.85,5744.57 5432.47,5727.95 D84.6@5494.09,5727.95
  Top Layer w13.78: R394.2@5442.91,5844.49 C229.1@5442.91,5903.54 ; D84.6@5494.09,5727.95 5512.8,5727.95 5560.43,5775.59 R393.1@5600.39,5775.59 R524.1@5600.39,5834.65 R332.1@5600.39,5893.7
$3N5729: OSC12.1 R340.2 | length 165.6
  Top Layer w29.53: OSC12.1@5151.57,5342.52 5194.88,5299.21 R340.2@5299.21,5299.21
$3N5730: C226.1 D84.13 R328.1 R338.2 R340.1 | length 506.6
  Top Layer w10: R340.1@5299.21,5366.14 R328.1@5368.11,5366.14
  Top Layer w13.78: R338.2@5102.36,5464.57 C226.1@5181.1,5464.57 5181.1,5476.85 5211.69,5476.85 5262.8,5527.95 D84.13@5281.5,5527.95 5328.24,5527.95 5368.11,5488.08 R328.1@5368.11,5366.14
$3N5755: FB14.2 R185.2 | length 70.9
  Bottom Layer w13.78: FB14.2@4929.13,5568.9 R185.2@5000,5568.9
$3N5756: D77.7 OSC13.1 R328.2 | length 172.1
  Top Layer w10: OSC13.1@5328.74,5204.72 5368.11,5244.09 R328.2@5368.11,5299.21
  Bottom Layer w13.78: OSC13.1@5328.74,5204.72 5334.25,5199.21 D77.7@5334.25,5145.67
$3N5758: FB15.2 R686.2 | length 76.8
  Bottom Layer w19.68: FB15.2@4840.55,5421.26 R686.2@4917.32,5421.26
$3N5759: C322.2 D77.6 OSC14.1 R525.2 | length 212.6
  Bottom Layer w13.78: OSC14.1@5279.53,5204.72 5289.37,5204.72 5283.86,5199.21 D77.6@5283.86,5145.67
  Bottom Layer w19.68: OSC14.1@5289.37,5204.72 C322.2@5289.37,5265.75 5333.58,5265.75 5337.52,5269.69 R525.2@5368.11,5269.69
$3N5760: C32.2 C174.1 D77.8 R525.1 R564.1 R686.1 | length 892.3
  Bottom Layer w19.68: R686.1@4992.13,5421.26 R564.1@4992.13,5332.68 5041.41,5332.68 5114.64,5405.92 5325.68,5405.92 5339.6,5392 5339.6,5365.13 R525.1@5368.11,5336.61 5421,5336.61 5458.66,5298.96 C174.1@5458.66,5214.57 5458.66,5172.24 5462.6,5168.31 C32.2@5462.6,5135.83 5430.04,5135.83 5420.2,5145.67 D77.8@5384.65,5145.67
$3N5761: FB16.2 R564.2 | length 86.6
  Bottom Layer w19.68: FB16.2@4830.71,5332.68 R564.2@4917.32,5332.68
$3N5762: D77.5 R67.2 | length 103.9
  Bottom Layer w19.68: R67.2@5210.63,5240.16 5210.63,5207.6 5216.64,5201.59 ; 5216.64,5201.55 5233.46,5184.72 D77.5@5233.46,5145.67
$3N6709: R1.2 R2.1 | length 246.1
  Top Layer w78.74: R2.1@958.66,7448.82 R1.2@1204.72,7448.82